# Altium PCB Hexapodik.PcbDoc
Units mm, origin at the board's own origin, x right, y up, seen from the top; angles counter-clockwise.
Board outline 65 x 56 mm, 2 copper layers (Top Layer, Bottom Layer); 169 components, 113 nets, 475 pads, 0 vias.
Unrouted connection lines stored in the file: 210.
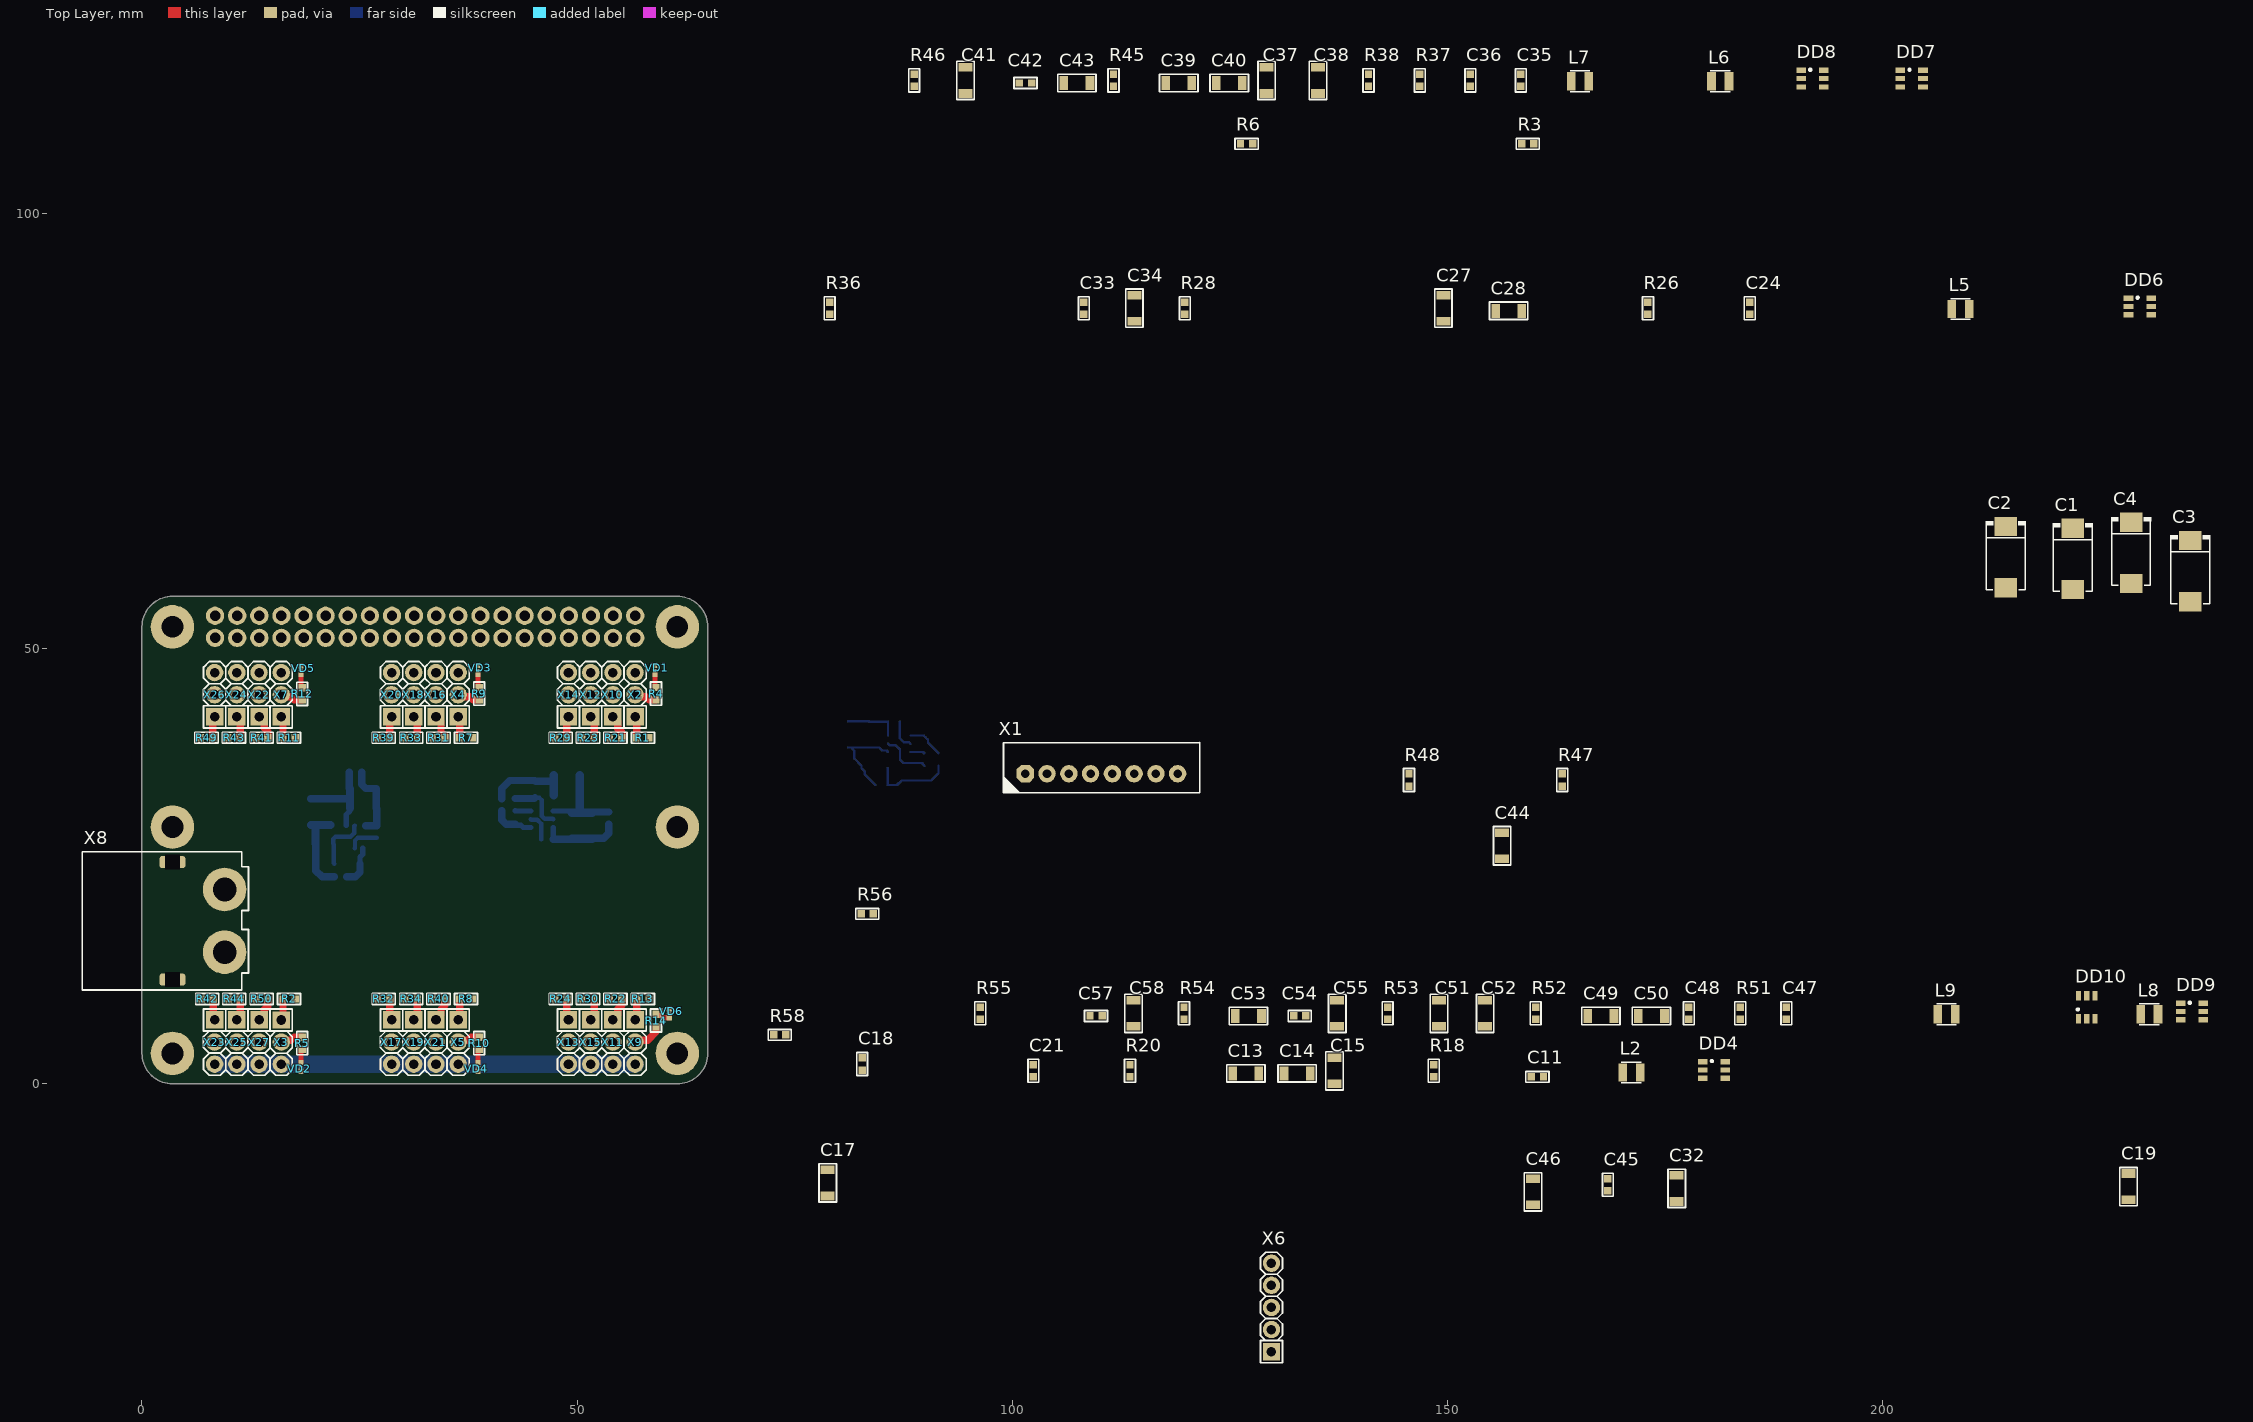
[diagram p0: Top Layer view]
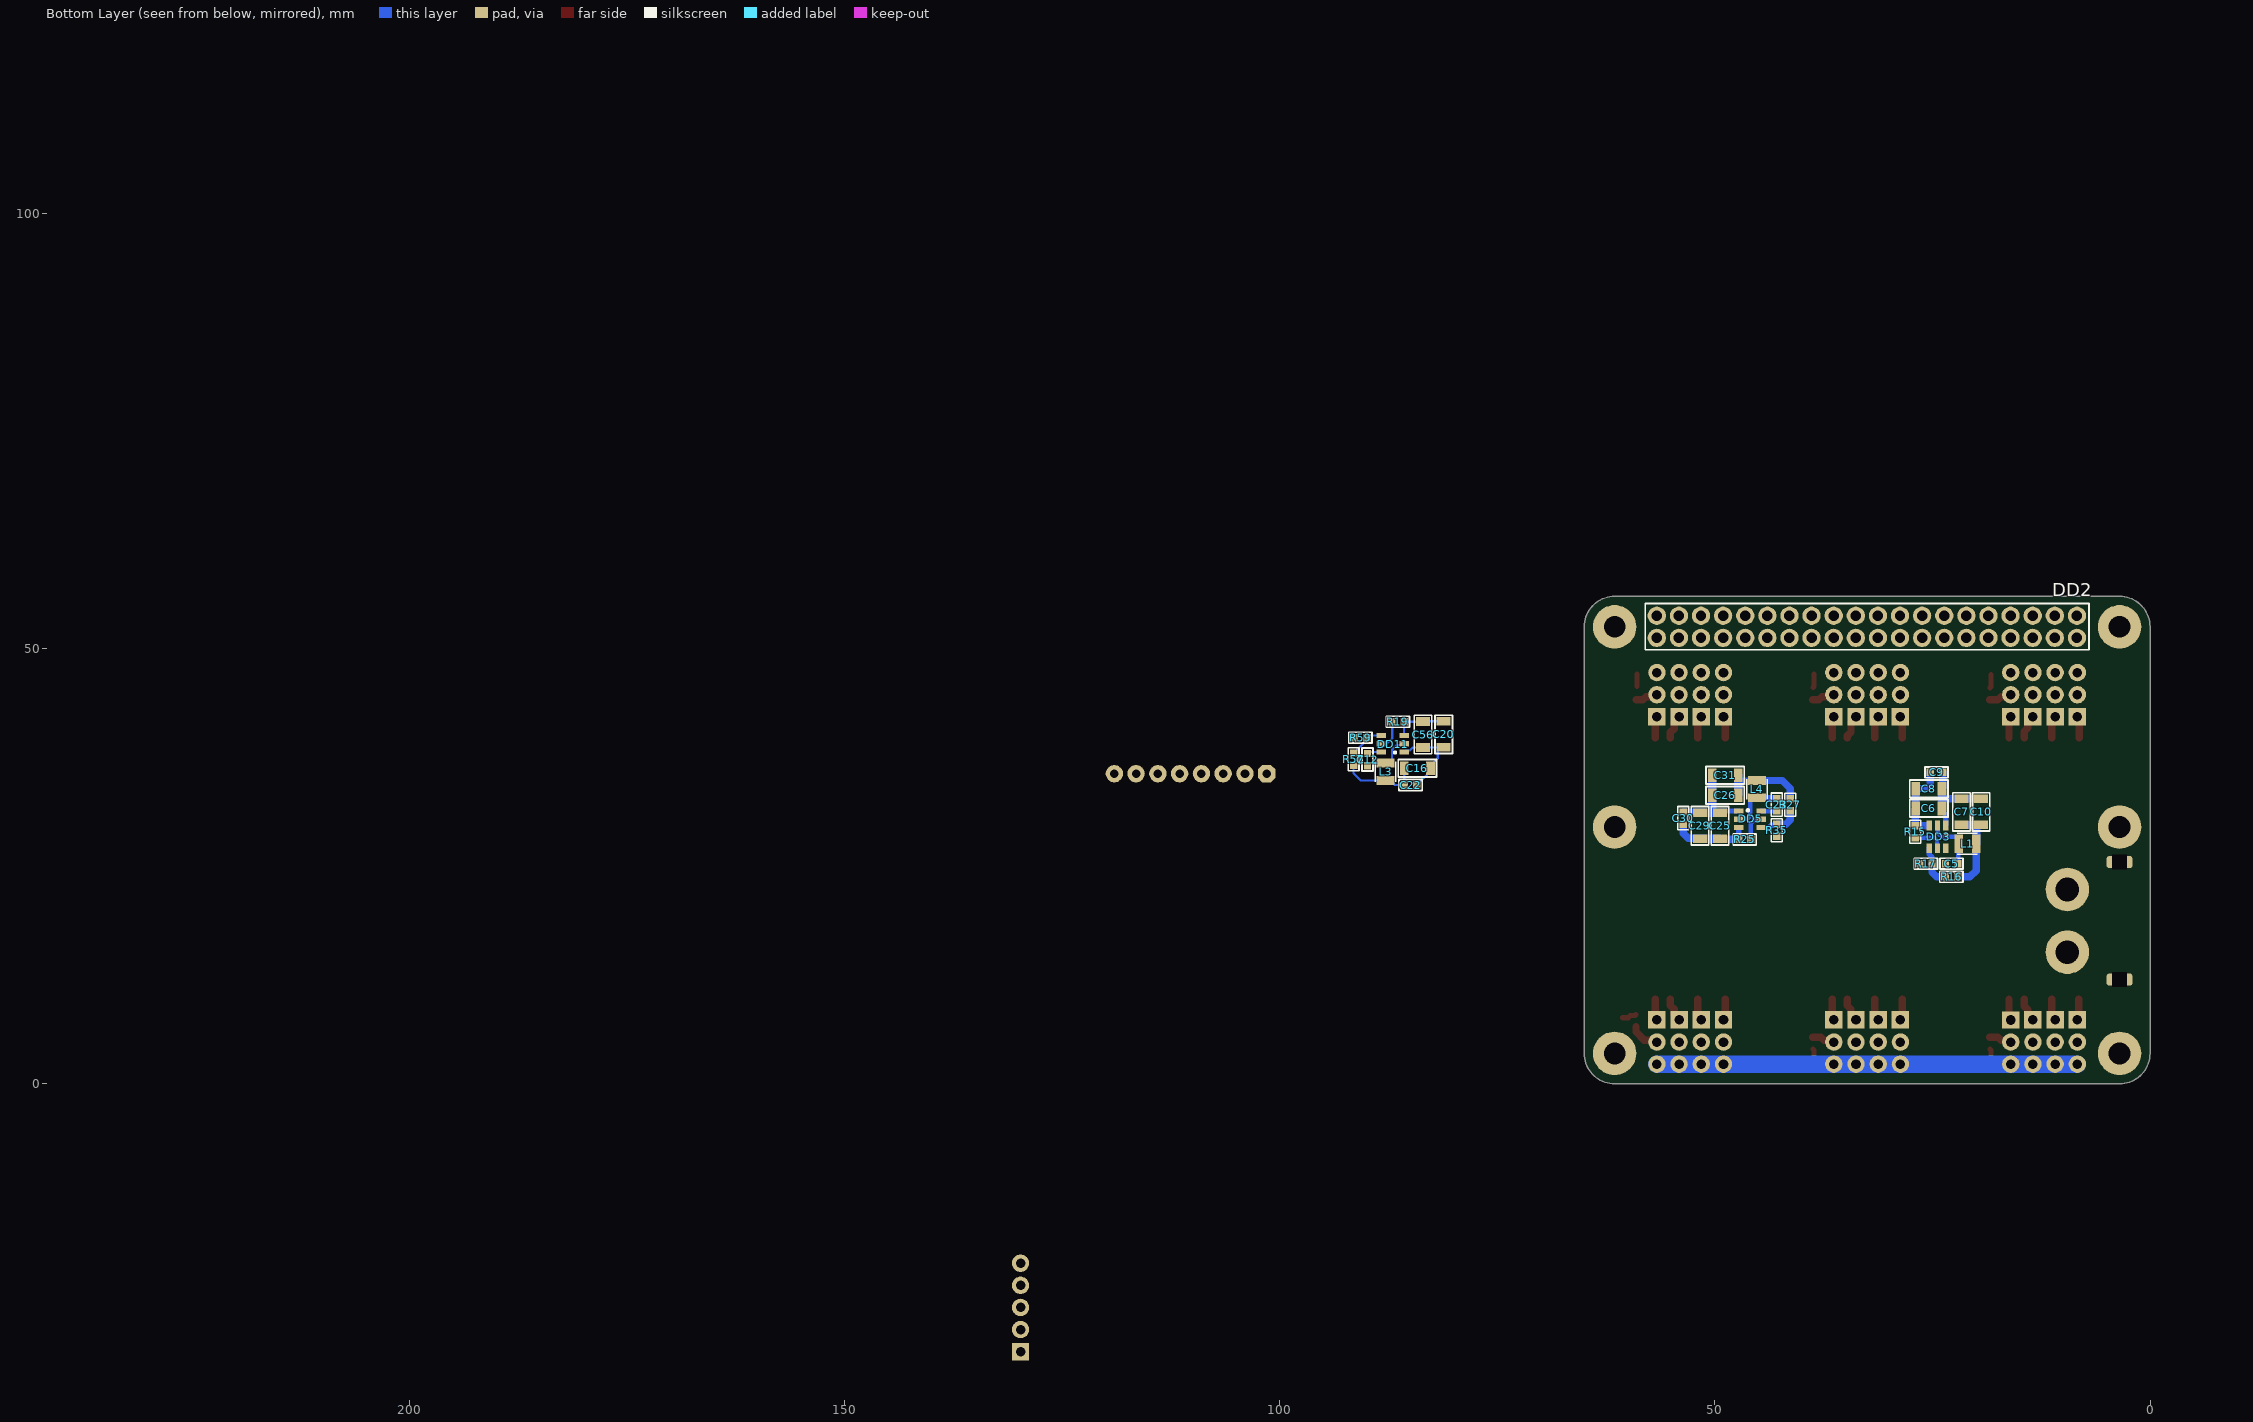
[diagram p1: Bottom Layer view, seen from below]

## Layer stack, top to bottom
Top Solder: solder mask 0.0102, Solder Resist, Dk 3.5
Top Layer: signal copper 0.0356
Dielectric 1: dielectric 0.32, FR-4, Dk 4.8
Bottom Layer: signal copper 0.0356
Bottom Solder: solder mask 0.0102, Solder Resist, Dk 3.5

## Board outline
0,3.5 0,52.5 cw(c3.5,52.5) 3.5,56 61.5,56 cw(c61.5,52.5) 65,52.5 65,3.5 cw(c61.5,3.5) 61.5,0 3.5,0 cw(c3.5,3.5)

## Design rules (kind name [scope] priority, off if disabled: settings)
Clearance Clearance_1 [All] p1: gap=0.125 ignorepadtopadclearanceinfootprint=FALSE except(0.2: Arc-Fill Arc-Poly Track-Fill Track-Poly SMDPad-SMDPad SMDPad-Fill SMDPad-Poly THPad-Fill THPad-Poly Via-Fill Via-Poly Fill-Fill Fill-Poly Poly-Poly Poly-Region Poly-Text; 0.25: Arc-Hole Track-Hole SMDPad-Hole THPad-Hole Via-Hole Fill-Hole Poly-Hole Region-Hole Text-Hole) // Standart
Clearance [All] p2: gap=0.254 ignorepadtopadclearanceinfootprint=FALSE
PolygonConnect [All] p1: connectstyle=Relief reliefconductorwidth=0.254 reliefentries=4 polygonreliefangle="90 Angle" airgapwidth=0.254
RoutingVias [All] p1: holewidth=0.711 width=1.27 viastyle="Through Hole" minholewidth=0.711 minwidth=1.27 maxholewidth=0.711 maxwidth=1.27
SolderMaskExpansion [All] p1: expansion=0.102 istentingtop=FALSE
SupplyNets "Schematic Supply Nets_45" [InNet('VBAT')] p1: voltage=0.000
SupplyNets "Schematic Supply Nets_44" [InNet('3V3')] p2: voltage=0.000
SupplyNets "Schematic Supply Nets_43" [InNet('B')] p3: voltage=0.000
SupplyNets "Schematic Supply Nets_42" [InNet('ML_Tibia')] p4: voltage=0.000
SupplyNets "Schematic Supply Nets_41" [InNet('FL')] p5: voltage=0.000
SupplyNets "Schematic Supply Nets_40" [InNet('MR')] p6: voltage=0.000
SupplyNets "Schematic Supply Nets_39" [InNet('FR_Femur')] p7: voltage=0.000
SupplyNets "Schematic Supply Nets_38" [InNet('Z')] p8: voltage=0.000
SupplyNets "Schematic Supply Nets_37" [InNet('MR_Femur')] p9: voltage=0.000
SupplyNets "Schematic Supply Nets_36" [InNet('Y')] p10: voltage=0.000
SupplyNets "Schematic Supply Nets_35" [InNet('A')] p11: voltage=0.000
SupplyNets "Schematic Supply Nets_34" [InNet('RR')] p12: voltage=0.000
SupplyNets "Schematic Supply Nets_33" [InNet('MR_6V')] p13: voltage=0.000
SupplyNets "Schematic Supply Nets_32" [InNet('FL_Femur')] p14: voltage=0.000
SupplyNets "Schematic Supply Nets_31" [InNet('MR_Tibia')] p15: voltage=0.000
SupplyNets "Schematic Supply Nets_30" [InNet('FR_6V')] p16: voltage=0.000
SupplyNets "Schematic Supply Nets_29" [InNet('FR_Coxa')] p17: voltage=0.000
SupplyNets "Schematic Supply Nets_28" [InNet('RL_6V')] p18: voltage=0.000
SupplyNets "Schematic Supply Nets_27" [InNet('RL_Femur')] p19: voltage=0.000
SupplyNets "Schematic Supply Nets_25" [InNet('FR')] p20: voltage=0.000
SupplyNets "Schematic Supply Nets_24" [InNet('MR_Coxa')] p21: voltage=0.000
SupplyNets "Schematic Supply Nets_23" [InNet('RL_Tibia')] p22: voltage=0.000
SupplyNets "Schematic Supply Nets_22" [InNet('RL')] p23: voltage=0.000
SupplyNets "Schematic Supply Nets_21" [InNet('FR_Tibia')] p24: voltage=0.000
SupplyNets "Schematic Supply Nets_20" [InNet('ML_Coxa')] p25: voltage=0.000
SupplyNets "Schematic Supply Nets_19" [InNet('ML_Femur')] p26: voltage=0.000
SupplyNets "Schematic Supply Nets_18" [InNet('RP_5V')] p27: voltage=0.000
SupplyNets "Schematic Supply Nets_17" [InNet('RR_Tibia')] p28: voltage=0.000
SupplyNets "Schematic Supply Nets_16" [InNet('RL_Coxa')] p29: voltage=0.000
SupplyNets "Schematic Supply Nets_15" [InNet('FL_Coxa')] p30: voltage=0.000
SupplyNets "Schematic Supply Nets_14" [InNet('X')] p31: voltage=0.000
SupplyNets "Schematic Supply Nets_13" [InNet('ML')] p32: voltage=0.000
SupplyNets "Schematic Supply Nets_12" [InNet('FL_Tibia')] p33: voltage=0.000
SupplyNets "Schematic Supply Nets_11" [InNet('RR_Coxa')] p34: voltage=0.000
SupplyNets "Schematic Supply Nets_10" [InNet('RR_Femur')] p35: voltage=0.000
SupplyNets "Schematic Supply Nets_9" [InNet('5V')] p36: voltage=0.000
SupplyNets "Schematic Supply Nets_8" [InNet('GND')] p37: voltage=0.000
SupplyNets "Schematic Supply Nets_7" [InNet('RPi_5V')] p38: voltage=0.000
SupplyNets "Schematic Supply Nets_6" [InNet('RPi_3V3')] p39: voltage=0.000
SupplyNets "Schematic Supply Nets_5" [InNet('TX')] p40: voltage=0.000
SupplyNets "Schematic Supply Nets_4" [InNet('FL_6V')] p41: voltage=0.000
SupplyNets "Schematic Supply Nets_3" [InNet('ML_6V')] p42: voltage=0.000
SupplyNets "Schematic Supply Nets_2" [InNet('C')] p43: voltage=0.000
SupplyNets "Schematic Supply Nets_1" [InNet('RR_6V')] p44: voltage=0.000
SupplyNets "Schematic Supply Nets" [InNet('RX')] p45: voltage=0.000
Width [All] p1: maxlimit=3 minlimit=0.2 preferedwidth=0.3 minimp=50.000000 maximp=50.000000 favimp=50.000000
30 further rules are at their usual default settings.

## Classes and differential pairs
component class PowerLegs: C23 C24 C25 C26 C27 C28 C29 C30 C31 C32 C33 C34 C35 C36 C37 C38 C39 C40 C41 C42 C43 C44 C45 C46 C47 C48 C49 C50 C51 C52 C53 C54 C55 C56 C57 C58 DD5 DD6 DD7 DD8 DD9 DD10 L4 L5 L6 L7 L8 L9 R21 R22 R23 R24 R25 R26 R27 R28 R29 R30 R31 R32 R33 R34 R35 R36 R37 R38 R39 R40 R41 R42 R43 R44 R45 R46 R47 R48 R49 R50 R51 R52 R53 R54 R55 R56 X10 X11 X12 X13 X14 X15 X16 X17 X18 X19 X20 X21 X22 X23 X24 X25 X26 X27
component class Hexa: C1 C2 C3 C4 C5 C6 C7 C8 C9 C10 C11 C12 C13 C14 C15 C16 C17 C18 C19 C20 C21 C22 DD1 DD2 DD3 DD4 DD11 L1 L2 L3 R1 R2 R3 R4 R5 R6 R7 R8 R9 R10 R11 R12 R13 R14 R15 R16 R17 R18 R19 R20 R57 R58 R59 VD1 VD2 VD3 VD4 VD5 VD6 X1 X2 X3 X4 X5 X6 X7 X8 X9

## Components (designator, comment, footprint, x,y, rotation, side; value= is the part's Value field where it differs from the comment)
C1 "Polymer Cap, 220uF, 35V, ±20%, 40mOhm@100kHz, SMD,7.3x4.3х1.9mm, -55...+125°C" "CAP: SMD_L7.3-W4.3-H1.9" 221.8,60.3 r90 top value=220uF
C2 "Polymer Cap, 470uF, 35V, ±20%, 40mOhm@100kHz, SMD,7.3x4.3х1.9mm, -55...+125°C" "CAP: SMD_L7.3-W4.3-H1.9" 214.1,60.5 r90 top value=470uF
C3 "Polymer Cap, 470uF, 35V, ±20%, 40mOhm@100kHz, SMD,7.3x4.3х1.9mm, -55...+125°C" "CAP: SMD_L7.3-W4.3-H1.9" 235.3,58.9 r90 top value=470uF
C4 "Polymer Cap, 100uF, 35V, ±20%, 40mOhm@100kHz, SMD,7.3x4.3х1.9mm, -55...+125°C" "CAP: SMD_L7.3-W4.3-H1.9" 228.5,61 r90 top value=100uF
C5 "Ceramic capacitor, 0.01uF, X7R, ±10%, 16V, 0603, -55...+125°C" "CAP: 0603" 22.8,25.3 r0 bottom value=0.1uF
C6 "Ceramic capacitor, 4,7uF, X7R, ±10%, 50V, 1206, -55...+125°C" "CAP: 1206" 25.4,31.65 r0 bottom value=10uF
C7 "Ceramic capacitor, 4,7uF, X7R, ±10%, 50V, 1206, -55...+125°C" "CAP: 1206" 21.65,31.25 r270 bottom value=22uF
C8 "Ceramic capacitor, 0.1uF, X7R, ±10%, 16V, 0603, -55...+125°C" "CAP: 1206" 25.4,33.9 r0 bottom value=10uF
C9 "Polymer Cap, 220uF, 35V, ±20%, 40mOhm@100kHz, SMD,7.3x4.3х1.9mm, -55...+125°C" "CAP: 0603" 24.525,35.775 r0 bottom value=0.1uF
C10 "Ceramic capacitor, 0.1uF, X7R, ±10%, 16V, 0603, -55...+125°C" "CAP: 1206" 19.4,31.25 r90 bottom value=22uF
C11 "Ceramic capacitor, 0.01uF, X7R, ±10%, 16V, 0603, -55...+125°C" "CAP: 0603" 160.3,0.8 r0 top value=0.1uF
C12 "Ceramic capacitor, 0.01uF, X7R, ±10%, 16V, 0603, -55...+125°C" "CAP: 0603" 89.892,37.252 r90 bottom value=0.1uF
C13 "Ceramic capacitor, 10uF, X7R, ±10%, 50V, 1206, -55...+125°C" "CAP: 1206" 126.8,1.2 r0 top value=10uF
C14 "Ceramic capacitor, 10uF, X7R, ±10%, 50V, 1206, -55...+125°C" "CAP: 1206" 132.7,1.2 r0 top value=22uF
C15 "Ceramic capacitor, 0.1uF, X7R, ±10%, 16V, 0603, -55...+125°C" "CAP: 1206" 137,1.5 r90 top value=10uF
C16 "Ceramic capacitor, 10uF, X7R, ±10%, 50V, 1206, -55...+125°C" "CAP: 1206" 84.167,36.252 r0 bottom value=22uF
C17 "Ceramic capacitor, 10uF, X7R, ±10%, 50V, 1206, -55...+125°C" "CAP: 1206" 78.775,-11.375 r90 top value=10uF
C18 "Ceramic capacitor, 0.1uF, X7R, ±10%, 16V, 0603, -55...+125°C" "CAP: 0603" 82.725,2.275 r90 top value=0.1uF
C19 "Polymer Cap, 330uF, 35V, ±20%, 40mOhm@100kHz, SMD,7.3x4.3х1.9mm, -55...+125°C" "CAP: 1206" 228.2,-11.8 r90 top value=22uF
C20 "Ceramic capacitor, 10uF, X7R, ±10%, 50V, 1206, -55...+125°C" "CAP: 1206" 81.142,40.152 r90 bottom value=10uF
C21 "Ceramic capacitor, 0.1uF, X7R, ±10%, 16V, 0603, -55...+125°C" "CAP: 0603" 102.4,1.5 r90 top value=0.1uF
C22 "Ceramic capacitor, 0.1uF, X7R, ±10%, 16V, 0603, -55...+125°C" "CAP: 0603" 84.942,34.327 r180 bottom value=22uF
C23 "Ceramic capacitor, 0.01uF, X7R, ±10%, 16V, 0603, -55...+125°C" "CAP: 0603" 42.875,32.075 r270 bottom value=0.1uF
C24 "Ceramic capacitor, 0.01uF, X7R, ±10%, 16V, 0603, -55...+125°C" "CAP: 0603" 184.699,89.1 r90 top value=0.1uF
C25 "Ceramic capacitor, 10uF, X7R, ±10%, 50V, 1206, -55...+125°C" "CAP: 1206" 49.4,29.65 r270 bottom value=10uF
C26 "Ceramic capacitor, 10uF, X7R, ±10%, 50V, 1206, -55...+125°C" "CAP: 1206" 48.8,33.15 r180 bottom value=22uF
C27 "Ceramic capacitor, 0.1uF, X7R, ±10%, 16V, 0603, -55...+125°C" "CAP: 1206" 149.499,89.1 r90 top value=10uF
C28 "Ceramic capacitor, 10uF, X7R, ±10%, 50V, 1206, -55...+125°C" "CAP: 1206" 156.999,88.8 r0 top value=22uF
C29 "Ceramic capacitor, 10uF, X7R, ±10%, 50V, 1206, -55...+125°C" "CAP: 1206" 51.7,29.65 r270 bottom value=10uF
C30 "Ceramic capacitor, 0.1uF, X7R, ±10%, 16V, 0603, -55...+125°C" "CAP: 0603" 53.625,30.525 r270 bottom value=0.1uF
C31 "Polymer Cap, 330uF, 35V, ±20%, 40mOhm@100kHz, SMD,7.3x4.3х1.9mm, -55...+125°C" "CAP: 1206" 48.8,35.45 r0 bottom value=22uF
C32 "Polymer Cap, 330uF, 35V, ±20%, 40mOhm@100kHz, SMD,7.3x4.3х1.9mm, -55...+125°C" "CAP: 1206" 176.3,-12.011 r90 top value=10uF
C33 "Ceramic capacitor, 0.1uF, X7R, ±10%, 16V, 0603, -55...+125°C" "CAP: 0603" 108.199,89.1 r90 top value=0.1uF
C34 "Ceramic capacitor, 0.1uF, X7R, ±10%, 16V, 0603, -55...+125°C" "CAP: 1206" 113.999,89.1 r90 top value=22uF
C35 "Ceramic capacitor, 0.1uF, X7R, ±10%, 16V, 0603, -55...+125°C" "CAP: 0603" 158.399,115.275 r90 top value=0.1uF
C36 "Ceramic capacitor, 0.1uF, X7R, ±10%, 16V, 0603, -55...+125°C" "CAP: 0603" 152.599,115.275 r90 top value=0.1uF
C37 "Ceramic capacitor, 0.01uF, X7R, ±10%, 16V, 0603, -55...+125°C" "CAP: 1206" 129.199,115.275 r90 top value=10uF
C38 "Ceramic capacitor, 0.01uF, X7R, ±10%, 16V, 0603, -55...+125°C" "CAP: 1206" 135.099,115.275 r90 top value=22uF
C39 "Ceramic capacitor, 10uF, X7R, ±10%, 50V, 1206, -55...+125°C" "CAP: 1206" 119.099,114.975 r0 top value=10uF
C40 "Ceramic capacitor, 10uF, X7R, ±10%, 50V, 1206, -55...+125°C" "CAP: 1206" 124.899,114.975 r0 top value=22uF
C41 "Ceramic capacitor, 0.1uF, X7R, ±10%, 16V, 0603, -55...+125°C" "CAP: 1206" 94.599,115.275 r90 top value=10uF
C42 "Ceramic capacitor, 10uF, X7R, ±10%, 50V, 1206, -55...+125°C" "CAP: 0603" 101.499,114.975 r0 top value=0.1uF
C43 "Ceramic capacitor, 10uF, X7R, ±10%, 50V, 1206, -55...+125°C" "CAP: 1206" 107.399,114.975 r0 top value=22uF
C44 "Ceramic capacitor, 0.1uF, X7R, ±10%, 16V, 0603, -55...+125°C" "CAP: 1206" 156.25,27.35 r90 top value=10uF
C45 "Polymer Cap, 330uF, 35V, ±20%, 40mOhm@100kHz, SMD,7.3x4.3х1.9mm, -55...+125°C" "CAP: 0603" 168.4,-11.6 r90 top value=0.1uF
C46 "Polymer Cap, 330uF, 35V, ±20%, 40mOhm@100kHz, SMD,7.3x4.3х1.9mm, -55...+125°C" "CAP: 1206" 159.8,-12.4 r90 top value=22uF
C47 "Ceramic capacitor, 0.1uF, X7R, ±10%, 16V, 0603, -55...+125°C" "CAP: 0603" 188.9,8.1 r90 top value=0.1uF
C48 "Ceramic capacitor, 0.1uF, X7R, ±10%, 16V, 0603, -55...+125°C" "CAP: 0603" 177.7,8.1 r90 top value=0.1uF
C49 "Ceramic capacitor, 10uF, X7R, ±10%, 50V, 1206, -55...+125°C" "CAP: 1206" 167.6,7.8 r0 top value=10uF
C50 "Ceramic capacitor, 22uF, X7R, ±10%, 50V, 1206, -55...+125°C" "CAP: 1206" 173.4,7.8 r0 top value=22uF
C51 "Ceramic capacitor, 0.01uF, X7R, ±10%, 16V, 0603, -55...+125°C" "CAP: 1206" 149,8.1 r90 top value=10uF
C52 "Ceramic capacitor, 0.01uF, X7R, ±10%, 16V, 0603, -55...+125°C" "CAP: 1206" 154.3,8.1 r90 top value=22uF
C53 "Ceramic capacitor, 10uF, X7R, ±10%, 50V, 1206, -55...+125°C" "CAP: 1206" 127.1,7.8 r0 top value=10uF
C54 "Ceramic capacitor, 10uF, X7R, ±10%, 50V, 1206, -55...+125°C" "CAP: 0603" 133,7.8 r0 top value=0.1uF
C55 "Ceramic capacitor, 0.1uF, X7R, ±10%, 16V, 0603, -55...+125°C" "CAP: 1206" 137.3,8.1 r90 top value=22uF
C56 "Ceramic capacitor, 10uF, X7R, ±10%, 50V, 1206, -55...+125°C" "CAP: 1206" 83.517,40.127 r90 bottom value=10uF
C57 "Ceramic capacitor, 10uF, X7R, ±10%, 50V, 1206, -55...+125°C" "CAP: 0603" 109.6,7.8 r0 top value=0.1uF
C58 "Ceramic capacitor, 0.1uF, X7R, ±10%, 16V, 0603, -55...+125°C" "CAP: 1206" 113.9,8.1 r90 top value=22uF
DD2 "RPi" "CON: PBD-40 (2.54)" 8.4,53.77 r270 bottom
DD3 "TPS565201" SOT23-6 24.425,28.375 r270 bottom
DD4 "TPS565201" SOT23-6 180.6,1.6 r0 top
DD5 "TPS565201" SOT23-6 45.95,30.4 r180 bottom
DD6 "TPS565201" SOT23-6 229.499,89.3 r0 top
DD7 "TPS565201" SOT23-6 203.299,115.475 r0 top
DD8 "TPS565201" SOT23-6 191.899,115.475 r0 top
DD9 "TPS565201" SOT23-6 235.499,8.3 r0 top
DD10 "TPS565201" SOT23-6 223.399,8.8 r90 top
DD11 "TPS565201" SOT23-6 86.992,39.077 r0 bottom
L1 "Fixed inductor, 22uH, ±20%, SMD,2x2.5mm, 1.1A," "IND: SMD_L2.5-W2.0" 20.975,27.575 r0 bottom value=3.3uH
L2 "Fixed inductor, 15uH, ±20%, SMD,2x2.5mm, 1.1A," "IND: SMD_L2.5-W2.0" 171.1,1.3 r0 top value=3.3uH
L3 "Fixed inductor, 15uH, ±20%, SMD,2x2.5mm, 1.1A," "IND: SMD_L2.5-W2.0" 87.817,35.852 r90 bottom value=3.3uH
L4 "Fixed inductor, 15uH, ±20%, SMD,2x2.5mm, 1.1A," "IND: SMD_L2.5-W2.0" 45.15,33.85 r270 bottom value=3.3uH
L5 "Fixed inductor, 15uH, ±20%, SMD,2x2.5mm, 1.1A," "IND: SMD_L2.5-W2.0" 208.899,89 r0 top value=3.3uH
L6 "Fixed inductor, 15uH, ±20%, SMD,2x2.5mm, 1.1A," "IND: SMD_L2.5-W2.0" 181.299,115.175 r0 top value=3.3uH
L7 "Fixed inductor, 15uH, ±20%, SMD,2x2.5mm, 1.1A," "IND: SMD_L2.5-W2.0" 165.199,115.175 r0 top value=3.3uH
L8 "Fixed inductor, 15uH, ±20%, SMD,2x2.5mm, 1.1A," "IND: SMD_L2.5-W2.0" 230.599,8 r0 top value=3.3uH
L9 "Fixed inductor, 15uH, ±20%, SMD,2x2.5mm, 1.1A," "IND: SMD_L2.5-W2.0" 207.3,8 r0 top value=3.3uH
R1 "Resistor film, 100R, ±5%, 0603, 0.1W, -55...+125°C" "RES: 0603" 57.55,39.75 r180 top value=100R
R2 "Resistor film, 100R, ±5%, 0603, 0.1W, -55...+125°C" "RES: 0603" 16.9,9.75 r180 top value=100R
R3 "Resistor film, 100R, ±5%, 0603, 0.1W, -55...+125°C" "RES: 0603" 159.199,107.975 r0 top value=100R
R4 "Resistor film, 100R, ±5%, 0603, 0.1W, -55...+125°C" "RES: 0603" 59.05,44.825 r270 top value=100R
R5 "Resistor film, 100R, ±5%, 0603, 0.1W, -55...+125°C" "RES: 0603" 18.4,4.675 r90 top value=100R
R6 "Resistor film, 100R, ±5%, 0603, 0.1W, -55...+125°C" "RES: 0603" 126.899,107.975 r0 top value=100R
R7 "Resistor film, 100R, ±5%, 0603, 0.1W, -55...+125°C" "RES: 0603" 37.225,39.75 r180 top value=100R
R8 "Resistor film, 100R, ±5%, 0603, 0.1W, -55...+125°C" "RES: 0603" 37.225,9.75 r180 top value=100R
R9 "Resistor film, 100R, ±5%, 0603, 0.1W, -55...+125°C" "RES: 0603" 38.725,44.825 r270 top value=100R
R10 "Resistor film, 100R, ±5%, 0603, 0.1W, -55...+125°C" "RES: 0603" 38.725,4.675 r90 top value=100R
R11 "Resistor film, 100R, ±5%, 0603, 0.1W, -55...+125°C" "RES: 0603" 16.9,39.775 r180 top value=100R
R12 "Resistor film, 100R, ±5%, 0603, 0.1W, -55...+125°C" "RES: 0603" 18.4,44.8 r270 top value=100R
R13 "Resistor film, 100R, ±5%, 0603, 0.1W, -55...+125°C" "RES: 0603" 57.55,9.75 r180 top value=100R
R14 "Resistor film, 100R, ±5%, 0603, 0.1W, -55...+125°C" "RES: 0603" 59.05,7.275 r270 top value=100R
R15 "Resistor film, 100R, ±5%, 0603, 0.1W, -55...+125°C" "RES: 0603" 26.975,28.95 r90 bottom value=100R
R16 "Resistor film, 100R, ±5%, 0603, 0.1W, -55...+125°C" "RES: 0603" 22.8,23.775 r0 bottom value=100R
R17 "Resistor film, 100R, ±5%, 0603, 0.1W, -55...+125°C" "RES: 0603" 25.75,25.3 r0 bottom value=100R
R18 "Resistor film, 100R, ±5%, 0603, 0.1W, -55...+125°C" "RES: 0603" 148.4,1.5 r90 top value=100R
R19 "Resistor film, 100R, ±5%, 0603, 0.1W, -55...+125°C" "RES: 0603" 86.392,41.602 r180 bottom value=100R
R20 "Resistor film, 100R, ±5%, 0603, 0.1W, -55...+125°C" "RES: 0603" 113.5,1.5 r90 top value=100R
R21 "Resistor film, 100R, ±5%, 0603, 0.1W, -55...+125°C" "RES: 0603" 54.4,39.75 r0 top value=100R
R22 "Resistor film, 100R, ±5%, 0603, 0.1W, -55...+125°C" "RES: 0603" 54.4,9.75 r0 top value=100R
R23 "Resistor film, 100R, ±5%, 0603, 0.1W, -55...+125°C" "RES: 0603" 51.25,39.75 r0 top value=100R
R24 "Resistor film, 100R, ±5%, 0603, 0.1W, -55...+125°C" "RES: 0603" 48.1,9.75 r0 top value=100R
R25 "Resistor film, 100R, ±5%, 0603, 0.1W, -55...+125°C" "RES: 0603" 46.55,28.075 r0 bottom value=100R
R26 "Resistor film, 100R, ±5%, 0603, 0.1W, -55...+125°C" "RES: 0603" 172.999,89.1 r90 top value=100R
R27 "Resistor film, 100R, ±5%, 0603, 0.1W, -55...+125°C" "RES: 0603" 41.325,32.05 r270 bottom value=100R
R28 "Resistor film, 100R, ±5%, 0603, 0.1W, -55...+125°C" "RES: 0603" 119.799,89.1 r90 top value=100R
R29 "Resistor film, 100R, ±5%, 0603, 0.1W, -55...+125°C" "RES: 0603" 48.1,39.75 r0 top value=100R
R30 "Resistor film, 100R, ±5%, 0603, 0.1W, -55...+125°C" "RES: 0603" 51.25,9.75 r0 top value=100R
R31 "Resistor film, 100R, ±5%, 0603, 0.1W, -55...+125°C" "RES: 0603" 34.075,39.75 r0 top value=100R
R32 "Resistor film, 100R, ±5%, 0603, 0.1W, -55...+125°C" "RES: 0603" 27.775,9.75 r0 top value=100R
R33 "Resistor film, 100R, ±5%, 0603, 0.1W, -55...+125°C" "RES: 0603" 30.925,39.75 r0 top value=100R
R34 "Resistor film, 100R, ±5%, 0603, 0.1W, -55...+125°C" "RES: 0603" 30.925,9.75 r0 top value=100R
R35 "Resistor film, 100R, ±5%, 0603, 0.1W, -55...+125°C" "RES: 0603" 42.875,29.125 r270 bottom value=100R
R36 "Resistor film, 100R, ±5%, 0603, 0.1W, -55...+125°C" "RES: 0603" 78.999,89.1 r90 top value=100R
R37 "Resistor film, 100R, ±5%, 0603, 0.1W, -55...+125°C" "RES: 0603" 146.799,115.275 r90 top value=100R
R38 "Resistor film, 100R, ±5%, 0603, 0.1W, -55...+125°C" "RES: 0603" 140.899,115.275 r90 top value=100R
R39 "Resistor film, 100R, ±5%, 0603, 0.1W, -55...+125°C" "RES: 0603" 27.775,39.75 r0 top value=100R
R40 "Resistor film, 100R, ±5%, 0603, 0.1W, -55...+125°C" "RES: 0603" 34.075,9.75 r0 top value=100R
R41 "Resistor film, 100R, ±5%, 0603, 0.1W, -55...+125°C" "RES: 0603" 13.75,39.775 r0 top value=100R
R42 "Resistor film, 100R, ±5%, 0603, 0.1W, -55...+125°C" "RES: 0603" 7.5,9.75 r0 top value=100R
R43 "Resistor film, 100R, ±5%, 0603, 0.1W, -55...+125°C" "RES: 0603" 10.575,39.775 r0 top value=100R
R44 "Resistor film, 100R, ±5%, 0603, 0.1W, -55...+125°C" "RES: 0603" 10.6,9.75 r0 top value=100R
R45 "Resistor film, 100R, ±5%, 0603, 0.1W, -55...+125°C" "RES: 0603" 111.599,115.275 r90 top value=100R
R46 "Resistor film, 100R, ±5%, 0603, 0.1W, -55...+125°C" "RES: 0603" 88.699,115.275 r90 top value=100R
R47 "Resistor film, 100R, ±5%, 0603, 0.1W, -55...+125°C" "RES: 0603" 163.149,34.9 r90 top value=100R
R48 "Resistor film, 100R, ±5%, 0603, 0.1W, -55...+125°C" "RES: 0603" 145.549,34.9 r90 top value=100R
R49 "Resistor film, 100R, ±5%, 0603, 0.1W, -55...+125°C" "RES: 0603" 7.425,39.775 r0 top value=100R
R50 "Resistor film, 100R, ±5%, 0603, 0.1W, -55...+125°C" "RES: 0603" 13.75,9.75 r0 top value=100R
R51 "Resistor film, 100R, ±5%, 0603, 0.1W, -55...+125°C" "RES: 0603" 183.6,8.1 r90 top value=100R
R52 "Resistor film, 100R, ±5%, 0603, 0.1W, -55...+125°C" "RES: 0603" 160.1,8.1 r90 top value=100R
R53 "Resistor film, 100R, ±5%, 0603, 0.1W, -55...+125°C" "RES: 0603" 143.1,8.1 r90 top value=100R
R54 "Resistor film, 100R, ±5%, 0603, 0.1W, -55...+125°C" "RES: 0603" 119.7,8.1 r90 top value=100R
R55 "Resistor film, 100R, ±5%, 0603, 0.1W, -55...+125°C" "RES: 0603" 96.3,8.1 r90 top value=100R
R56 "Resistor film, 100R, ±5%, 0603, 0.1W, -55...+125°C" "RES: 0603" 83.325,19.525 r0 top value=100R
R57 "Resistor film, 100R, ±5%, 0603, 0.1W, -55...+125°C" "RES: 0603" 91.492,37.277 r90 bottom value=100R
R58 "Resistor film, 100R, ±5%, 0603, 0.1W, -55...+125°C" "RES: 0603" 73.275,5.625 r0 top value=100R
R59 "Resistor film, 100R, ±5%, 0603, 0.1W, -55...+125°C" "RES: 0603" 90.692,39.777 r0 bottom value=100R
VD1 "LED, Green, *, *, *, -55...+150°C" "LED: 0402B" 58.925,47.55 r270 top
VD2 "LED, Green, *, *, *, -55...+150°C" "LED: 0402B" 18.275,1.95 r90 top
VD3 "LED, Green, *, *, *, -55...+150°C" "LED: 0402B" 38.6,47.55 r270 top
VD4 "LED, Green, *, *, *, -55...+150°C" "LED: 0402B" 38.6,1.95 r90 top
VD5 "LED, Green, *, *, *, -55...+150°C" "LED: 0402B" 18.275,47.525 r270 top
VD6 "LED, Green, *, *, *, -55...+150°C" "LED: 0402B" 60.575,8.1 r270 top
X1 "Connector, 8pin, 2.54mm, 500VAC, 3A" "CON: CWF-8" 110.225,35.625 r0 top
X2 "Connector, 3pin, 2.54mm, 500VAC, 3A" "CON: PLS-3" 56.65,44.7 r90 top
X3 "Connector, 3pin, 2.54mm, 500VAC, 3A" "CON: PLS-3" 16,4.795 r270 top
X4 "Connector, 3pin, 2.54mm, 500VAC, 3A" "CON: PLS-3" 36.325,44.7 r90 top
X5 "Connector, 3pin, 2.54mm, 500VAC, 3A" "CON: PLS-3" 36.325,4.8 r270 top
X6 "Connector, 5pin, 2.54mm, 500VAC, 3A" "CON: PLS-5" 129.75,-25.685 r90 top
X7 "Connector, 3pin, 2.54mm, 500VAC, 3A" "CON: PLS-3" 16,44.7 r90 top
X8 "Connector, 2pin, 2.54mm, 500VAC, 3A" "CON: XT60PW-M" 9.5,18.725 r90 top
X9 "Connector, 3pin, 2.54mm, 500VAC, 3A" "CON: PLS-3" 56.65,4.8 r270 top
X10 "Connector, 3pin, 2.54mm, 500VAC, 3A" "CON: PLS-3" 54.1,44.7 r90 top
X11 "Connector, 3pin, 2.54mm, 500VAC, 3A" "CON: PLS-3" 54.1,4.8 r270 top
X12 "Connector, 3pin, 2.54mm, 500VAC, 3A" "CON: PLS-3" 51.55,44.7 r90 top
X13 "Connector, 3pin, 2.54mm, 500VAC, 3A" "CON: PLS-3" 49,4.8 r270 top
X14 "Connector, 3pin, 2.54mm, 500VAC, 3A" "CON: PLS-3" 49,44.7 r90 top
X15 "Connector, 3pin, 2.54mm, 500VAC, 3A" "CON: PLS-3" 51.55,4.8 r270 top
X16 "Connector, 3pin, 2.54mm, 500VAC, 3A" "CON: PLS-3" 33.775,44.7 r90 top
X17 "Connector, 3pin, 2.54mm, 500VAC, 3A" "CON: PLS-3" 28.675,4.8 r270 top
X18 "Connector, 3pin, 2.54mm, 500VAC, 3A" "CON: PLS-3" 31.225,44.7 r90 top
X19 "Connector, 3pin, 2.54mm, 500VAC, 3A" "CON: PLS-3" 31.225,4.8 r270 top
X20 "Connector, 3pin, 2.54mm, 500VAC, 3A" "CON: PLS-3" 28.675,44.7 r90 top
X21 "Connector, 3pin, 2.54mm, 500VAC, 3A" "CON: PLS-3" 33.775,4.8 r270 top
X22 "Connector, 3pin, 2.54mm, 500VAC, 3A" "CON: PLS-3" 13.45,44.7 r90 top
X23 "Connector, 3pin, 2.54mm, 500VAC, 3A" "CON: PLS-3" 8.35,4.8 r270 top
X24 "Connector, 3pin, 2.54mm, 500VAC, 3A" "CON: PLS-3" 10.9,44.7 r90 top
X25 "Connector, 3pin, 2.54mm, 500VAC, 3A" "CON: PLS-3" 10.9,4.8 r270 top
X26 "Connector, 3pin, 2.54mm, 500VAC, 3A" "CON: PLS-3" 8.35,44.7 r90 top
X27 "Connector, 3pin, 2.54mm, 500VAC, 3A" "CON: PLS-3" 13.45,4.8 r270 top

## Footprints (in the part's own frame and the unit in brackets; to place one, negate y for a bottom-side part, rotate by r counter-clockwise, add the part's x,y. Pads: shape width x height; smd on the part's side, far side on the other; paste and mask are expansions set on the pad)
"CAP: 0603" [mm]
  rect 0.85x0.85 smd: 1(-0.7,0) 2(0.7,0)
  silkscreen extent -1.33,-0.63 1.33,0.63, body extent -0.8,-0.4 0.8,0.4, height 0.3
"CAP: 1206" [mm]
  rect 1x1.6 smd: 1(-1.5,0) 2(1.5,0)
  silkscreen extent -2.2,-1 2.2,1, body extent -1.6,-0.8 1.6,0.8, height 1
"CAP: SMD_L7.3-W4.3-H1.9" [mm] "Polymer SMD"
  rect 2.207x2.592 smd: 1(3.511,0) 2(-3.511,0)
  silkscreen extent -3.73,-2.3 4.11,2.3, body extent -3.65,-2.15 3.65,2.15, height 1.9
"CON: CWF-8" [mm]
  oct 2x2 hole 1: 1(-8.75,0)
  round 2 hole 1: 2(-6.25,0) 3(-3.75,0) 4(-1.25,0) 5(1.25,0) 6(3.75,0) 7(6.25,0) 8(8.75,0)
  round 0.5 on Top Overlay: ""(-11.775,-2.05)
  silkscreen extent -11.25,-2.2 11.3,3.58, body extent -11.25,-2.2 11.25,3.55, height 7.1
"CON: PBD-40 (2.54)" [mm]
  round 2.1 hole 1.2: 1(2.54,0) 2(0,0) 3(2.54,-2.54) 4(0,-2.54) 5(2.54,-5.08) 6(0,-5.08) 7(2.54,-7.62) 8(0,-7.62) 9(2.54,-10.16) 10(0,-10.16) 11(2.54,-12.7) 12(0,-12.7) 13(2.54,-15.24) 14(0,-15.24) 15(2.54,-17.78) 16(0,-17.78) 17(2.54,-20.32) 18(0,-20.32) 19(2.54,-22.86) 20(0,-22.86) 21(2.54,-25.4) 22(0,-25.4) 23(2.54,-27.94) 24(0,-27.94) 25(2.54,-30.48) 26(0,-30.48) 27(2.54,-33.02) 28(0,-33.02) 29(2.54,-35.56) 30(0,-35.56) 31(2.54,-38.1) 32(0,-38.1) 33(2.54,-40.64) 34(0,-40.64) 35(2.54,-43.18) 36(0,-43.18) 37(2.54,-45.72) 38(0,-45.72) 39(2.54,-48.26) 40(0,-48.26)
  silkscreen extent -1.4,-49.6 3.9,1.4, body extent -1.27,-49.53 3.81,1.27, height 8.4
"CON: PLS-3" [mm]
  rect 2x2 hole 1.1: 1(-2.54,0)
  round 2 hole 1.1: 2(0,0) 3(2.54,0)
  silkscreen extent -3.81,-1.27 3.81,1.27, body extent -3.81,-1.27 3.81,1.27, height 8.54
"CON: PLS-5" [mm]
  rect 2x2 hole 1.1: 1(-5.08,0)
  round 2 hole 1.1: 2(-2.54,0) 3(0,0) 4(2.54,0) 5(5.08,0)
  silkscreen extent -6.35,-1.27 6.35,1.27, body extent -6.35,-1.27 6.35,1.27, height 8.54
"CON: XT60PW-M" [mm]
  round 5 hole 2.7: 1(-3.6,0) 2(3.6,0)
  rrect50% 1.4x3 hole 1.7 square: MH(-6.75,6) MH(6.75,6)
  silkscreen extent -7.95,-2.75 7.95,16.35, body extent -7.95,-1.95 7.95,16.35, height 8.5
"IND: SMD_L2.5-W2.0" [mm]
  rect 1x2.1 smd: 1(-1,0) 2(1,0)
  silkscreen extent -1.14,-1.19 1.14,1.19, body extent -1.26,-1.01 1.26,1.01, height 1.02
"LED: 0402B" [mm]
  rect 0.6x0.6 smd: 1(-0.5,0) 2(0.5,0)
  oval 0.1x0.4 on Top Overlay: ""(-0.95,0.45)
  oval 0.4x0.1 on Top Overlay: ""(-0.95,0.45)
  silkscreen extent 0,-0.2 0,0.2, body extent -0.5,-0.25 0.51,0.25, height 0.45
"RES: 0603" [mm]
  rect 0.85x0.85 smd: 1(-0.7,0) 2(0.7,0)
  silkscreen extent -1.33,-0.63 1.33,0.63, body extent -0.8,-0.4 0.8,0.4, height 0.44
SOT23-6 [mm] "pitch 0.95 mm"
  rect 1.1x0.6 smd: 1(-1.3,0.95) 2(-1.3,0) 3(-1.3,-0.95) 4(1.3,-0.95) 5(1.3,0) 6(1.3,0.95)
  round 0.5 on Mech1: ""(-1,1.1)
  silkscreen extent -0.38,0.89 -0.13,1.14, body extent -1.4,-1.45 1.4,1.45, height 1.45

## Part data
C1 C2 C3 C4: library part Polymer_7.3x4.3x1.9, Manufacturer=Ymin, Package=SMD,7.3x4.3х1.9mm, PartNumber=MPD220M1VD19040R, Temperature=-55...+125°C, Tolerance=±20%, TypeCapacitor="Polymer Cap", TypeDielectric=Polymer, Voltage=35V, HelpURL=https://jlcpcb.com/partdetail/Ymin-MPD220M1VD19040R/C2997487, Impedance=40mOhm@100kHz, SupplierCode=C2997487
  C1: ValueManufacturerPartNumber="Polymer Cap, 220uF, 35V, ±20%, 40mOhm@100kHz, SMD,7.3x4.3х1.9mm, -55...+125°C"
  C2 C3: ValueManufacturerPartNumber="Polymer Cap, 470uF, 35V, ±20%, 40mOhm@100kHz, SMD,7.3x4.3х1.9mm, -55...+125°C"
  C4: ValueManufacturerPartNumber="Polymer Cap, 100uF, 35V, ±20%, 40mOhm@100kHz, SMD,7.3x4.3х1.9mm, -55...+125°C"
C5 C9 C11 C12 C23 C24 C42 C45 C54 C57: library part Ceramic_0603, Manufacturer=Yageo, Package=0603, PartNumber=CC0603KRX7R7BB104, Temperature=-55...+125°C, Tolerance=±10%, TypeCapacitor="Ceramic capacitor", TypeDielectric=X7R, ValueManufacturerPartNumber="Ceramic capacitor, 0.1uF, X7R, ±10%, 16V, 0603, -55...+125°C", Voltage=16V, HelpURL=https://www.digikey.com/product-detail/en/yageo/CC0603KRX7R7BB104/311-1088-1-ND/302998
C6 C8 C15 C27 C32 C37 C41 C44 C51: library part Ceramic_1206, Manufacturer=Yageo, Package=1206, PartNumber=CC1206KRX7R9BB104, Temperature=-55...+125°C, Tolerance=±10%, TypeCapacitor="Ceramic capacitor", TypeDielectric=X7R, ValueManufacturerPartNumber="Ceramic capacitor, 10uF, X7R, ±10%, 50V, 1206, -55...+125°C", Voltage=50V, HelpURL=https://www.digikey.com/product-detail/en/yageo/CC1206KRX7R9BB104/311-1179-1-ND/303089
C7 C10 C14 C16 C19 C22 C26 C28 C31 C34 C38 C40 C43 C46 C52 C55 C58: library part Ceramic_1206, Manufacturer=Yageo, Package=1206, PartNumber=CC1206KRX7R9BB104, Temperature=-55...+125°C, Tolerance=±10%, TypeCapacitor="Ceramic capacitor", TypeDielectric=X7R, ValueManufacturerPartNumber="Ceramic capacitor, 22uF, X7R, ±10%, 50V, 1206, -55...+125°C", Voltage=50V, HelpURL=https://www.digikey.com/product-detail/en/yageo/CC1206KRX7R9BB104/311-1179-1-ND/303089
C13 C17 C20 C25 C29 C39 C49 C50 C53 C56: library part Ceramic_1206, Manufacturer=Yageo, Package=1206, PartNumber=CC1206KRX7R9BB104, Temperature=-55...+125°C, Tolerance=±10%, TypeCapacitor="Ceramic capacitor", TypeDielectric=X7R, Voltage=50V, HelpURL=https://www.digikey.com/product-detail/en/yageo/CC1206KRX7R9BB104/311-1179-1-ND/303089
  C13 C17 C20 C25 C29 C39 C49 C53 C56: ValueManufacturerPartNumber="Ceramic capacitor, 10uF, X7R, ±10%, 50V, 1206, -55...+125°C"
  C50: ValueManufacturerPartNumber="Ceramic capacitor, 22uF, X7R, ±10%, 50V, 1206, -55...+125°C"
C18 C21 C30 C33 C35 C36 C47 C48: library part Ceramic_0603, Manufacturer=Yageo, Package=0603, PartNumber=CC0603KRX7R7BB104, Temperature=-55...+125°C, Tolerance=±10%, TypeCapacitor="Ceramic capacitor", TypeDielectric=X7R, Voltage=16V, HelpURL=https://www.digikey.com/product-detail/en/yageo/CC0603KRX7R7BB104/311-1088-1-ND/302998, ValueManufacturerPartNumber="Ceramic capacitor, 0.1uF, X7R, ±10%, 16V, 0603, -55...+125°C"
L1 L2 L3 L4 L5 L6 L7 L8 L9: library part Inductor_FTC252010S220MBCA, Manufacturer=Sunlord, MaxCurrent=1.1A, Package=SMD,2x2.5mm, PartNumber=FTC252010S220MBCA, Tolerance=±20%, TypeInductor="Fixed inductor", ValueManufacturerPartNumber="Fixed inductor, 3.3uH, ±20%, SMD,2x2.5mm, 1.1A,", HelpURL=https://jlcpcb.com/partdetail/6763511-FTC252010S220MBCA/C5832391, SupplierCode=C5832391
R1 R2 R3 R4 R5 R6 R7 R8 R9 R10 R11 R12 R13 R14 R15 R16 R17 R18 R19 R20 R21 R22 R23 R24 R25 R26 R27 R28 R29 R30 R31 R32 R33 R34 R35 R36 R37 R38 R39 R40 R41 R42 R43 R44 R45 R46 R47 R48 R49 R50 R51 R52 R53 R54 R55 R56 R57 R58 R59: library part Resistor_0603, Manufacturer=Yageo, Package=0603, PartNumber=RC0603JR-07100RL, Power=0.1W, Temperature=-55...+125°C, Tolerance=±5%, TypeResistor="Resistor film", HelpURL=https://www.digikey.com/product-detail/en/yageo/RC0603JR-07100RL/311-100GRCT-ND/729644, ValueManufacturerPartNumber="Resistor film, 100R, ±5%, 0603, 0.1W, -55...+125°C"
VD1 VD2 VD3 VD4 VD5 VD6: library part LED_single, Color=GREEN, ColorParameter=Green, Temperature=-55...+150°C, TypeDiode=LED, ValueManufacturerPartNumber="LED, Green, *, *, *, -55...+150°C"
X1: library part PLS-8, Current=3A, Manufacturer=Connfly, Voltage=500VAC, HelpURL=https://www.chipdip.ru/product/pls-8-ds1021-1-8sf112, Multichannel=8pin, PartNumber=PLS-8, Pitch=2.54mm, TypeConnector=Connector, ValueManufacturerPartNumber="Connector, 8pin, 2.54mm, 500VAC, 3A"
X2 X3 X4 X5 X7 X9 X10 X11 X12 X13 X14 X15 X16 X17 X18 X19 X20 X21 X22 X23 X24 X25 X26 X27: library part PLS-3, Current=3A, Manufacturer=Connfly, Voltage=500VAC, HelpURL=https://www.chipdip.ru/product/pls-3, Multichannel=3pin, PartNumber=PLS-3, Pitch=2.54mm, TypeConnector=Connector, ValueManufacturerPartNumber="Connector, 3pin, 2.54mm, 500VAC, 3A"
X6: library part PLS-5, Current=3A, Manufacturer=Connfly, Voltage=500VAC, HelpURL=https://www.chipdip.ru/product/pls-5, Multichannel=5pin, PartNumber=PLS-5, Pitch=2.54mm, TypeConnector=Connector, ValueManufacturerPartNumber="Connector, 5pin, 2.54mm, 500VAC, 3A"
X8: library part PLS-2, Current=3A, Manufacturer=Connfly, Voltage=500VAC, HelpURL=https://www.chipdip.ru/product/pls-2, Multichannel=2pin, PartNumber=PLS-2, Pitch=2.54mm, TypeConnector=Connector, ValueManufacturerPartNumber="Connector, 2pin, 2.54mm, 500VAC, 3A"

## Free pads (board coordinates)
  round 5 hole 2.5 mask+0.075: GND(3.5,3.5) GND(3.5,29.5) GND(3.5,52.5) GND(61.5,3.5) GND(61.5,29.5) GND(61.5,52.5)

## Nets (pads, with @x,y where several pads share a name; then routed paths per layer and width w, separated by ;. In a path a pad name is that pad's centre, name@x,y a point inside that pad or via, vN(x,y) a via of type N, cw(c..) or ccw(c..) an arc to the next point about the centre after c; other vN are vias at no path point)
3V3: R1.1 R2.1 R7.1 R8.1 R11.1 R13.1 X6.3 X6.4
5V: C16.2 C22.1 L3.1 R57.1 X6.1 X6.2 | length 9.2
  Bottom Layer w0.254: C16.2 85.667,34.352 C22.1 86.742,34.327 87.267,34.852 L3.1 90.667,34.852 91.492,35.677 R57.1
A: DD2.33 X1.4
B: DD2.36 X1.5
C: DD2.35 X1.6
FL: R1.2 X2.1 | length 2.5
  Top Layer w0.85: X2.1 56.85,41.96 56.85,40.525 R1.2
FL_6V: C26.2 C31.1 L4.1 R27.1 X10.2 X12.2 X14.2 | length 10
  Bottom Layer w0.85: R27.1 41.325,33.925 42.25,34.85 L4.1 45.225,34.775 46.975,34.775 47.3,34.45
  Bottom Layer w1: C26.2 47.3,33.45 47.3,34.45 C31.1
FL_Coxa: R21.1
FL_Femur: R23.1
FL_Tibia: R29.1
FR: R13.2 X9.1 | length 2.5
  Top Layer w0.85: X9.1 56.85,7.54 R13.2
FR_6V: C28.2 C34.1 L5.1 R28.1 X11.2 X13.2 X15.2
FR_Coxa: R22.1
FR_Femur: R24.1
FR_Tibia: R30.1
GND: C1.2 C2.2 C3.2 C4.2 C6.1 C7.1 C8.1 C9.1 C10.2 C13.1 C14.1 C15.1 C16.1 C17.1 C18.1 C19.2 C20.1 C22.2 C25.1 C26.1 C27.1 C28.1 C29.1 C30.1 C31.2 C34.2 C37.1 C38.1 C39.1 C40.1 C41.1 C42.1 C43.1 C44.1 C46.2 C49.1 C50.1 C51.1 C52.1 C53.1 C54.1 C55.1 C56.1 C57.1 C58.1 DD2.6 DD2.9 DD2.14 DD2.20 DD2.25 DD2.30 DD2.34 DD2.39 DD3.1 DD4.1 DD5.1 DD6.1 DD7.1 DD8.1 DD9.1 DD10.1 DD11.1 R17.2 R35.2 R36.2 R47.2 R48.2 R55.2 R56.2 R58.2 R59.2 X1.8 X2.3 X3.3 X4.3 X5.3 X6.5 X7.3 X8.1 X9.3 X10.3 X11.3 X12.3 X13.3 X14.3 X15.3 X16.3 X17.3 X18.3 X19.3 X20.3 X21.3 X22.3 X23.3 X24.3 X25.3 X26.3 X27.3 | length 80.2
  Bottom Layer w0.254: C22.2 83.04,35.529 83.04,35.879 C16.1 82.667,36.552 81.815,37.404 81.815,38.279 81.442,38.652 C20.1 83.492,38.652 C56.1 84.698,38.627 85.025,38.3 85.519,38.3 DD11.1
  Bottom Layer w0.6: DD3.1 23.475,30.925 C6.1@23.9,31.35 ; DD5.1 49.2,31.35 C25.1
  Bottom Layer w0.85: C9.1 23.825,33.975 C8.1 ; C29.1 51.775,31.225 C30.1
  Bottom Layer w0.9: C10.2 C7.1 23.875,32.75 23.9,32.775 ; C6.1 23.9,32.775 ; C8.1 23.9,32.775
  Bottom Layer w1: C25.1 50.3,31.15 ; C31.2 50.3,33.45 C26.1 50.3,31.15 ; C29.1 50.3,31.15
  Bottom Layer w2: X23.3 X17.3 X19.3 X21.3 X5.3 X9.3
ML: R7.2 X4.1 | length 2.5
  Top Layer w0.85: X4.1 36.525,41.96 R7.2
ML_6V: C38.2 C43.2 L6.1 R45.1 X16.2 X18.2 X20.2
ML_Coxa: R31.1
ML_Femur: R33.1
ML_Tibia: R39.1
MR: R8.2 X5.1 | length 2.5
  Top Layer w0.85: X5.1 36.525,7.54 R8.2
MR_6V: C40.2 C46.1 L7.1 R46.1 X17.2 X19.2 X21.2
MR_Coxa: R32.1
MR_Femur: R34.1
MR_Tibia: R40.1
NetC5_1: C5.1 DD3.2 L1.2 | length 6.5
  Bottom Layer w0.5: C5.1 22.037,25.362 22.037,27.512 L1.2 21.975,28.125 22.225,28.375 23.95,28.375 24.375,28.8 24.375,29.625 DD3.2
NetC5_2: C5.2 DD3.6
NetC11_1: C11.1 DD4.2 L2.2
NetC11_2: C11.2 DD4.6
NetC12_1: C12.1 DD11.2 L3.2 | length 5.9
  Bottom Layer w0.254: DD11.2 85.865,38.904 86.565,38.904 87.067,38.402 87.067,37.225 87.44,36.852 L3.2 ; L3.2@87.822,36.847 89.597,36.847 C12.1
NetC12_2: C12.2 DD11.6 | length 1.7
  Bottom Layer w0.254: DD11.6 89.717,38.127 C12.2
NetC23_1: C23.1 DD5.2 L4.2 | length 6.5
  Bottom Layer w0.5: L4.2 45.675,32.85 45.925,32.6 45.925,30.775 46.25,30.45 47.2,30.45 DD5.2
  Bottom Layer w0.85: C23.1 45.075,32.775 L4.2
NetC23_2: C23.2 DD5.6 | length 1.8
  Bottom Layer w0.6: C23.2 42.9,31.35 DD5.6
NetC24_1: C24.1 DD6.2 L5.2
NetC24_2: C24.2 DD6.6
NetC35_1: C35.1 DD7.2 L6.2
NetC35_2: C35.2 DD7.6
NetC36_1: C36.1 DD8.2 L7.2
NetC36_2: C36.2 DD8.6
NetC47_1: C47.1 DD9.2 L8.2
NetC47_2: C47.2 DD9.6
NetC48_1: C48.1 DD10.2 L9.2
NetC48_2: C48.2 DD10.6
NetDD1_1: R3.1
NetDD1_2: R6.1
NetDD3_4: DD3.4 R16.2 R17.1 | length 4.7
  Bottom Layer w0.6: R17.1 25.05,26.05 25.375,26.375 DD3.4
  Bottom Layer w0.85: R16.2 24.525,23.775 25.05,24.3 R17.1
NetDD3_5: DD3.5 R15.1 | length 3.5
  Bottom Layer w0.5: DD3.5 24.475,27.125 24.475,27.95 24.775,28.25 R15.1
NetDD4_4: DD4.4 R20.2 R58.1
NetDD4_5: DD4.5 R18.1
NetDD5_4: DD5.4 R27.2 R35.1 | length 4.7
  Bottom Layer w0.6: R35.1 43,29.7 43.55,29.7 43.8,29.45 DD5.4
  Bottom Layer w0.85: R27.2 41.325,30.323 41.823,29.825 R35.1
NetDD5_5: DD5.5 R25.1 | length 3.2
  Bottom Layer w0.5: DD5.5 44.7,30.35 45.4,30.35 45.85,29.9 R25.1
NetDD6_4: DD6.4 R28.2 R36.1
NetDD6_5: DD6.5 R26.1
NetDD7_4: DD7.4 R45.2 R47.1
NetDD7_5: DD7.5 R37.1
NetDD8_4: DD8.4 R46.2 R48.1
NetDD8_5: DD8.5 R38.1
NetDD9_4: DD9.4 R53.2 R55.1
NetDD9_5: DD9.5 R51.1
NetDD10_4: DD10.4 R54.2 R56.1
NetDD10_5: DD10.5 R52.1
NetDD11_4: DD11.4 R57.2 R59.1 | length 4.3
  Bottom Layer w0.254: DD11.4 89.792,40.027 89.992,39.827 90.29,39.529 90.29,39.179 R57.2
NetDD11_5: DD11.5 R19.1 | length 3.4
  Bottom Layer w0.254: R19.1 87.042,41.552 87.042,39.702 87.494,39.25 88.119,39.25 DD11.5
NetR4_1: R4.1 VD1.2 | length 1.4
  Top Layer w0.6: R4.1@58.925,45.65 VD1.2
NetR4_2: R4.2 X2.2 | length 2.6
  Top Layer w0.85: X2.2 56.87,44.48 57.895,44.48 58.25,44.125 R4.2
NetR5_1: R5.1 VD2.2 | length 1.6
  Top Layer w0.6: VD2.2 18.275,3.85 R5.1
NetR5_2: R5.2 X3.2 | length 2.6
  Top Layer w0.85: X3.2 16.22,5.015 17.115,5.015 17.475,5.375 R5.2
NetR9_1: R9.1 VD3.2 | length 1.6
  Top Layer w0.6: VD3.2 38.6,45.65 R9.1
NetR9_2: R9.2 X4.2 | length 2.6
  Top Layer w0.85: X4.2 36.545,44.48 37.67,44.48 38.025,44.125 R9.2
NetR10_1: R10.1 VD4.2 | length 1.6
  Top Layer w0.6: VD4.2 38.6,3.85 R10.1
NetR10_2: R10.2 X5.2 | length 2.6
  Top Layer w0.85: X5.2 36.545,5.02 37.445,5.02 37.8,5.375 R10.2
NetR12_1: R12.1 VD5.2 | length 1.6
  Top Layer w0.6: VD5.2 18.275,45.625 R12.1
NetR12_2: R12.2 X7.2 | length 2.6
  Top Layer w0.85: X7.2 16.22,44.48 17.12,44.48 17.5,44.1 R12.2
NetR14_1: R14.1 VD6.2 | length 1.7
  Top Layer w0.6: R14.1 59.175,7.85 59.7,7.85 59.95,7.6 VD6.2
NetR14_2: R14.2 X9.2 | length 3.5
  Top Layer w0.85: X9.2 56.87,5.02 58.095,5.02 59.05,5.975 R14.2
NetR21_2: R21.2 X10.1 | length 2.8
  Top Layer w0.85: X10.1 54.675,41.585 54.675,40.8 55.1,40.375 R21.2
NetR22_2: R22.2 X11.1 | length 2.8
  Top Layer w0.85: X11.1 54.675,7.915 54.675,8.575 55.1,9 R22.2
NetR23_2: R23.2 X12.1 | length 2.6
  Top Layer w0.85: X12.1 51.95,41.76 R23.2
NetR24_2: R24.2 X13.1 | length 2.5
  Top Layer w0.85: R24.2 48.8,7.54 X13.1
NetR29_2: R29.2 X14.1 | length 2.5
  Top Layer w0.85: R29.2 48.8,41.96 X14.1
NetR30_2: R30.2 X15.1 | length 2.6
  Top Layer w0.85: X15.1 51.95,7.74 R30.2
NetR31_2: R31.2 X16.1 | length 2.8
  Top Layer w0.85: X16.1 34.35,41.585 34.35,40.403 34.775,39.978 R31.2
NetR32_2: R32.2 X17.1 | length 2.5
  Top Layer w0.85: R32.2 28.475,7.54 X17.1
NetR33_2: R33.2 X18.1 | length 2.6
  Top Layer w0.85: X18.1 31.625,41.76 R33.2
NetR34_2: R34.2 X19.1 | length 2.6
  Top Layer w0.85: X19.1 31.625,7.74 R34.2
NetR39_2: R39.2 X20.1 | length 2.5
  Top Layer w0.85: R39.2 28.475,41.96 X20.1
NetR40_2: R40.2 X21.1 | length 2.8
  Top Layer w0.85: X21.1 34.35,7.915 34.35,8.575 34.775,9 R40.2
NetR41_2: R41.2 X22.1 | length 2.8
  Top Layer w0.85: X22.1 14.025,41.585 14.025,40.9 14.45,40.475 R41.2
NetR42_2: R42.2 X23.1 | length 2.5
  Top Layer w0.85: R42.2 8.2,7.49 X23.1
NetR43_2: R43.2 X24.1 | length 2.5
  Top Layer w0.85: X24.1 11.275,41.785 R43.2
NetR44_2: R44.2 X25.1 | length 2.6
  Top Layer w0.85: X25.1 11.3,7.74 R44.2
NetR49_2: R49.2 X26.1 | length 2.5
  Top Layer w0.85: R49.2 8.125,41.935 X26.1
NetR50_2: R50.2 X27.1 | length 2.8
  Top Layer w0.85: X27.1 14.025,7.915 14.025,8.5 14.45,8.925 R50.2
RL: R11.2 X7.1 | length 2.5
  Top Layer w0.85: X7.1 16.2,41.96 16.2,40.55 R11.2
RL_6V: C50.2 C55.2 L8.1 R53.1 X22.2 X24.2 X26.2
RL_Coxa: R41.1
RL_Femur: R43.1
RL_Tibia: R49.1
RP_5V: C1.1 C7.2 C10.1 L1.1 R16.1 VD1.1 VD2.1 VD3.1 VD4.1 VD5.1 VD6.1 X1.7 | length 10.3
  Bottom Layer w0.85: L1.1@19.925,27.625 L1.1 19.975,24.5 20.7,23.775 R16.1
  Bottom Layer w0.9: L1.1@19.925,27.625 19.925,29.525 19.7,29.75 C10.1 C7.2
RPi_3V3: DD2.1 DD2.17
RPi_5V: C2.1 C14.2 C19.1 DD2.2 DD2.4 L2.1 R20.1
RR: R2.2 X3.1 | length 2.5
  Top Layer w0.85: X3.1 16.2,7.535 R2.2
RR_6V: C52.2 C58.2 L9.1 R54.1 X23.2 X25.2 X27.2
RR_Coxa: R42.1
RR_Femur: R44.1
RR_Tibia: R50.1
RX: DD2.8 R6.2
TX: DD2.10 R3.2
VBAT: C3.1 C4.1 C6.2 C8.2 C9.2 C13.2 C15.2 C17.2 C18.2 C20.2 C21.2 C25.2 C27.2 C29.2 C30.2 C32.2 C33.2 C37.2 C39.2 C41.2 C42.2 C44.2 C45.2 C49.2 C51.2 C53.2 C54.2 C56.2 C57.2 DD3.3 DD4.3 DD5.3 DD6.3 DD7.3 DD8.3 DD9.3 DD10.3 DD11.3 R15.2 R18.2 R19.2 R25.2 R26.2 R37.2 R38.2 R51.2 R52.2 X8.2 | length 24
  Bottom Layer w0.254: C20.2 83.492,41.652 C56.2 83.542,41.602 R19.2 DD11.3
  Bottom Layer w0.6: R25.2 DD5.3
  Bottom Layer w0.85: C9.2 25.225,34.423 25.723,33.925 26.875,33.925 C8.2 26.9,31.675 26.975,31.6 R15.2 25.7,29.65 ; R25.2 49.325,28.075 C25.2 ; C29.2 51.775,28.225 53.05,28.225 53.625,28.8 C30.2
  Bottom Layer w1: C25.2 C29.2
X: DD2.29 X1.1
Y: DD2.31 X1.2
Z: DD2.32 X1.3
pads on no net: C21.1 C32.1 C33.1 C45.1 DD2.3 DD2.5 DD2.7 DD2.11 DD2.12 DD2.13 DD2.15 DD2.16 DD2.18 DD2.19 DD2.21 DD2.22 DD2.23 DD2.24 DD2.26 DD2.27 DD2.28 DD2.37 DD2.38 DD2.40 DD3. DD4. DD5. DD6. DD7. DD8. DD9. DD10. DD11. VD1. VD2. VD3. VD4. VD5. VD6. X1. X8.MH

## Silkscreen, mask and mechanical layers (free items; w line width, h text height)
Mechanical 1:
  lines w0.1: 0,3.5 ccw(c3.5,3.5) 3.5,0 61.5,0 ccw(c61.5,3.5) 65,3.5 65,52.5 ccw(c61.5,52.5) 61.5,56 3.4,56 3.5,56 ccw(c3.5,52.5) 0,52.5 0,3.5